# Altium PCB LB77.PcbDoc
Units mm, origin at the board's own origin, x right, y up, seen from the top; angles counter-clockwise.
Board outline 113 x 68 mm, 2 copper layers (Top Layer, Bottom Layer), stack 1.571 mm thick; 61 components, 50 nets, 271 pads, 342 vias.
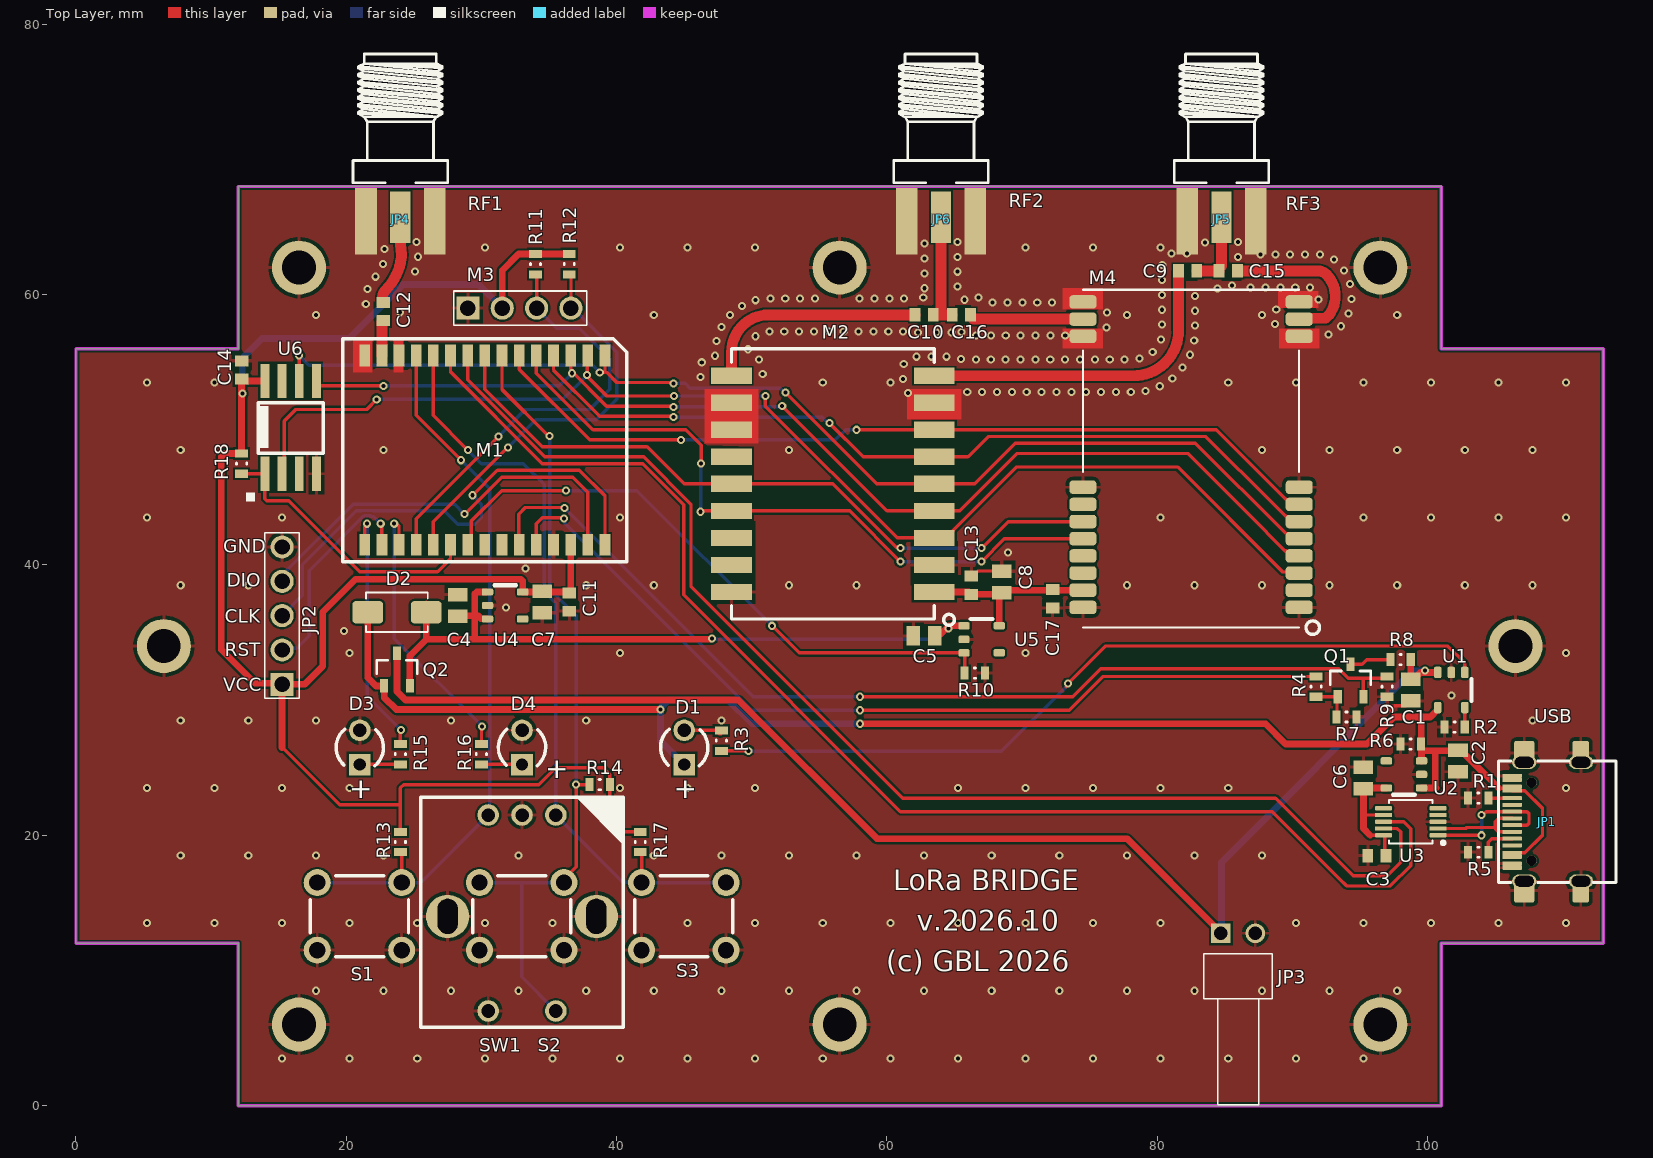
[diagram p0: Top Layer view]
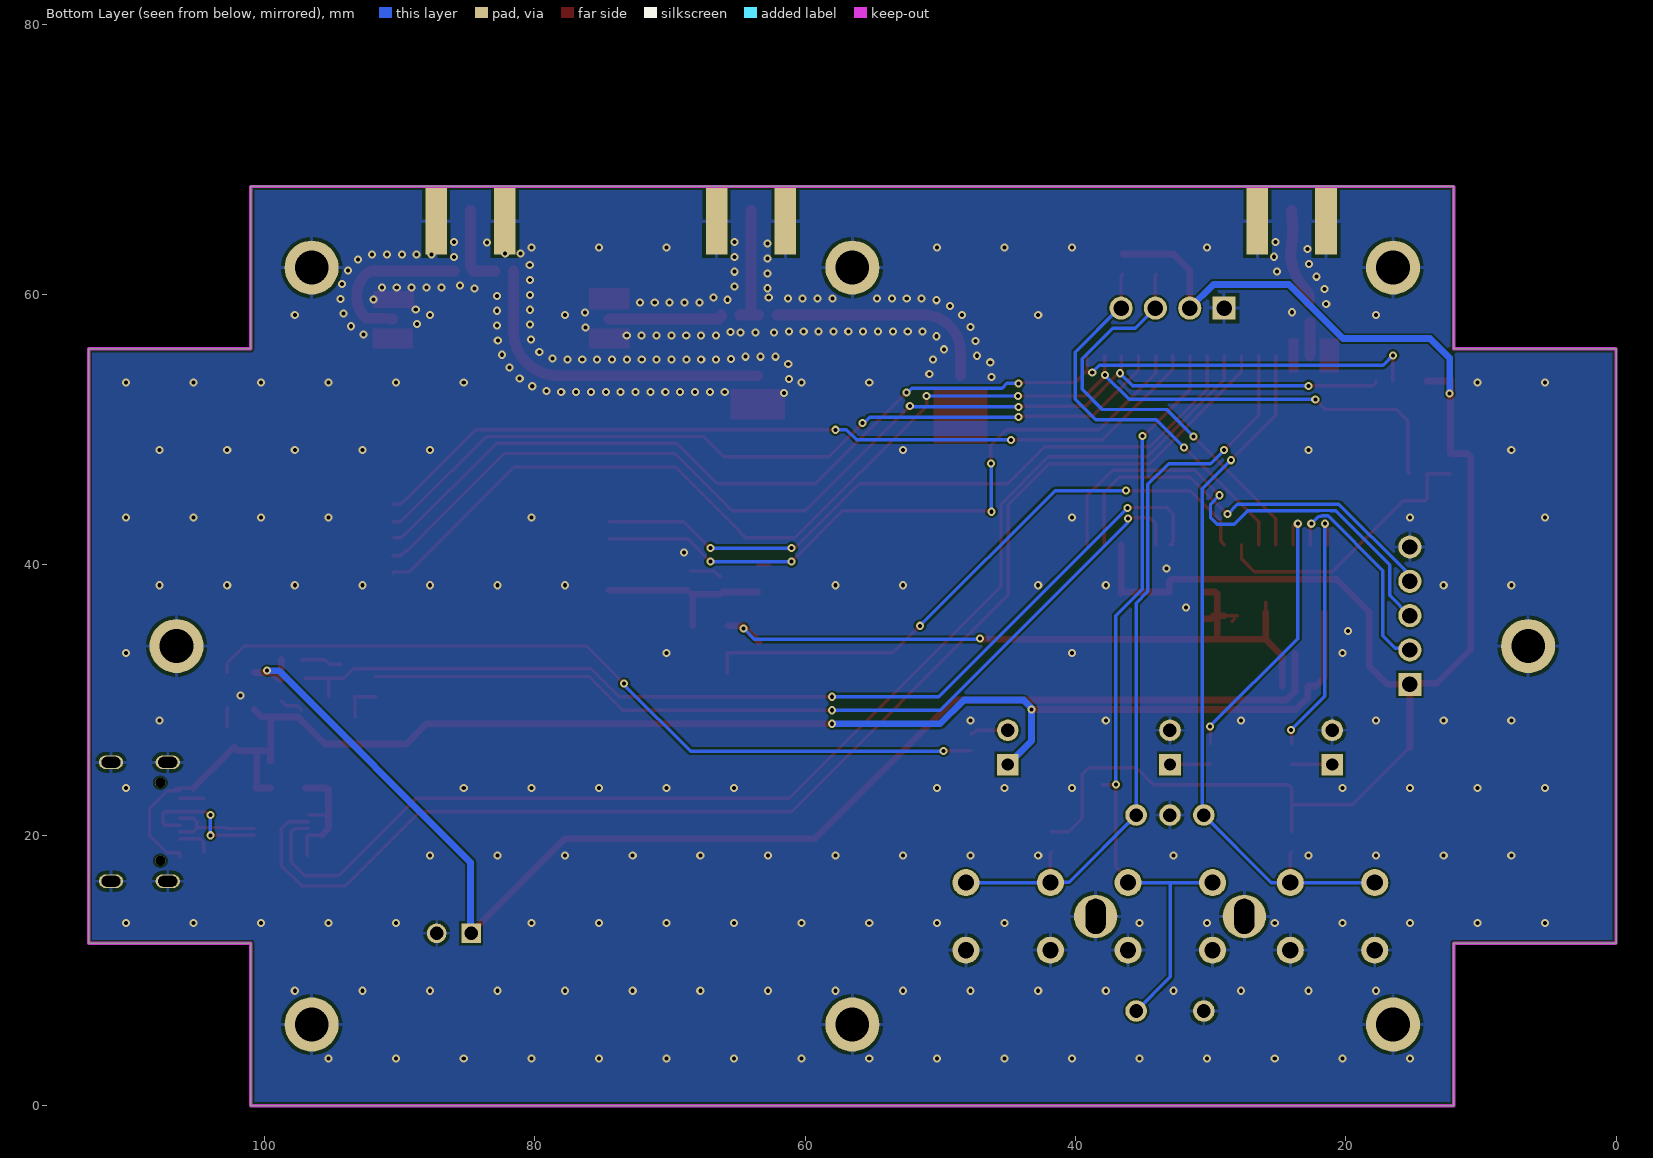
[diagram p1: Bottom Layer view, seen from below]
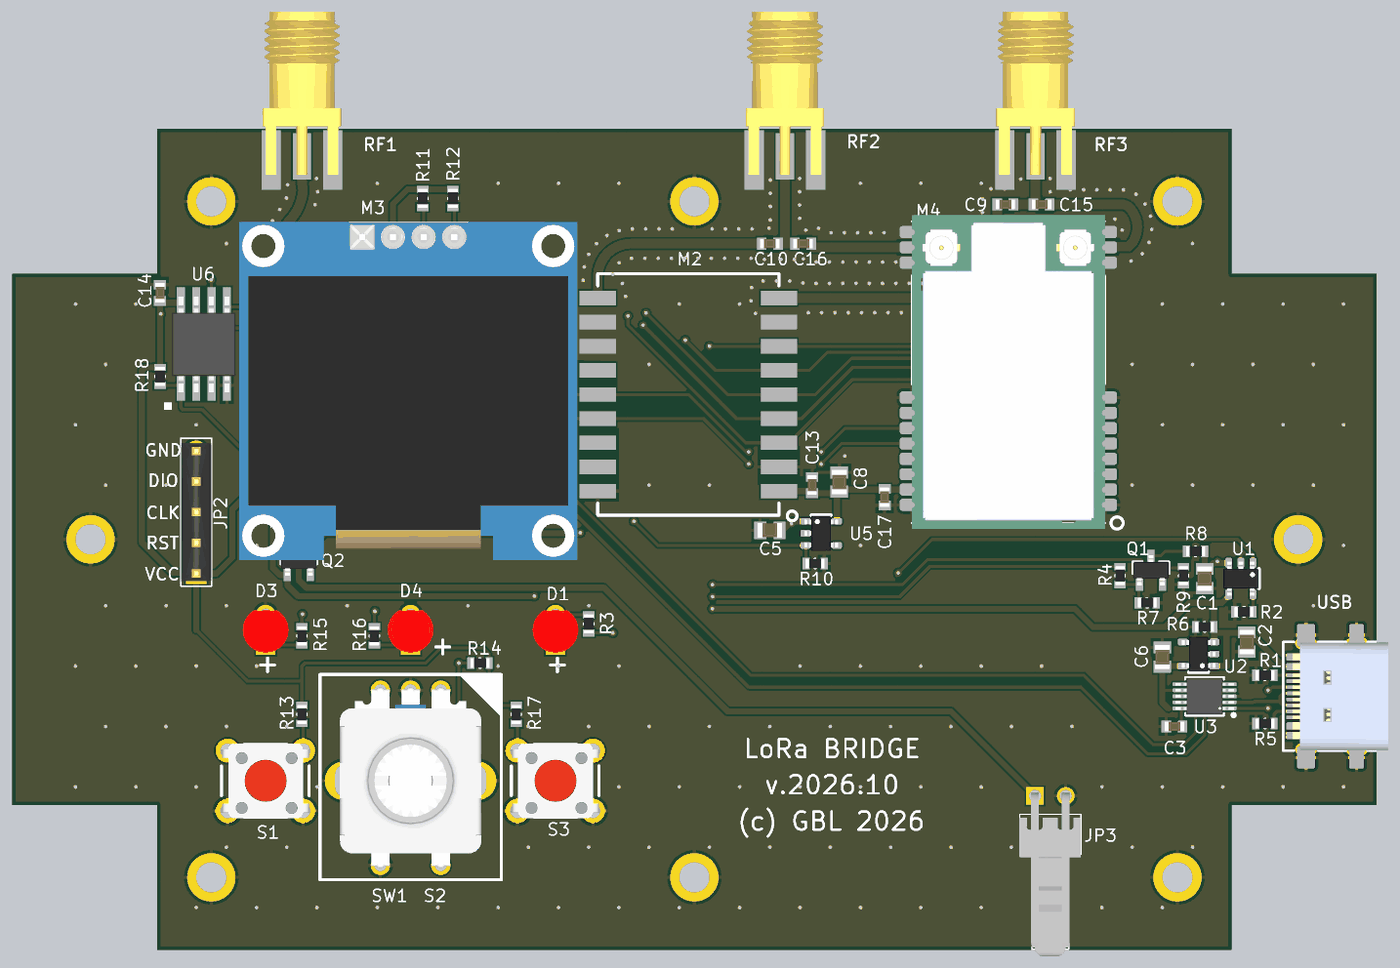
[diagram p2: 3D render of the assembled board from above, using the file's embedded part models]

## Layer stack, top to bottom
Top Solder: solder mask 0.0102, Solder Resist, Dk 3.5
Top Layer: signal copper 0.0356
Dielectric 1: dielectric 1.5, FR-4, Dk 4.8
Bottom Layer: signal copper 0.0356
Bottom Solder: solder mask 0.0102, Solder Resist, Dk 3.5

## Board outline
0,12 0,56 12,56 12,68 101,68 101,56 113,56 113,12 101,12 101,0 12,0 12,12

## Design rules (kind name [scope] priority, off if disabled: settings)
Clearance [All] p1: gap=0.15 ignorepadtopadclearanceinfootprint=FALSE
ComponentClearance ComponentClearance_1 [InComponent('SW1') vs InComponent('S2')] p1: gap=-20 collisioncheckmode=3 verticalgap=-20 showdistances=FALSE
ComponentClearance [All] p2: gap=0.25 collisioncheckmode=3 verticalgap=0.25 showdistances=FALSE
HoleSize [All] p1: absolutevalues=TRUE maxlimit=3.5 minlimit=0.025 maxpercent=80.000 minpercent=20.000
MinimumSolderMaskSliver [All] p1: minsoldermaskwidth=0.05
PolygonConnect PolygonConnect_3 [HasFootprint('SMA_F_EDGE') vs IsNamedPolygon('GND_L01_P000')] p1: connectstyle=Direct reliefconductorwidth=0.254 reliefentries=4 polygonreliefangle="90 Angle" airgapwidth=0.254
PolygonConnect PolygonConnect_2 [All vs IsNamedPolygon('GND_L01_P000') Or IsNamedPolygon('GND_L02_P001')] p2: thpad.connectstyle=Relief thpad.reliefconductorwidth=0.254 thpad.reliefentries=4 thpad.polygonreliefangle="90 Angle" thpad.airgapwidth=0.254 smdpad.connectstyle=Relief smdpad.reliefconductorwidth=0.254 smdpad.reliefentries=4 smdpad.polygonreliefangle="90 Angle" smdpad.airgapwidth=0.254 via.connectstyle=Direct via.reliefconductorwidth=0.254 via.reliefentries=4 via.polygonreliefangle="90 Angle" via.airgapwidth=0.254
PolygonConnect [All] p3: connectstyle=Relief reliefconductorwidth=0.254 reliefentries=4 polygonreliefangle="90 Angle" airgapwidth=0.254
RoutingVias [All] p1: holewidth=0.711 width=1.27 viastyle="Through Hole" minholewidth=0.711 minwidth=1.27 maxholewidth=0.711 maxwidth=1.27
SilkToSilkClearance [All] p1: silktosilkclearance=0.1
SilkToSolderMaskClearance [IsPad] p1: minsilkscreentomaskgap=0.1 clearancetoexposedcopper=TRUE
SolderMaskExpansion [All] p1: expansion=0 istentingtop=FALSE
SupplyNets "Schematic Supply Nets_5" [InNet('VBUS')] p1: voltage=0.000
SupplyNets "Schematic Supply Nets_4" [InNet('VCC2')] p2: voltage=0.000
SupplyNets "Schematic Supply Nets_3" [InNet('GND')] p3: voltage=0.000
SupplyNets "Schematic Supply Nets_2" [InNet('VCC1')] p4: voltage=0.000
SupplyNets "Schematic Supply Nets_1" [InNet('VCC')] p5: voltage=0.000
SupplyNets "Schematic Supply Nets" [InNet('V_BATT')] p6: voltage=0.000
Width [All] p1: maxlimit=2 minlimit=0.2 preferedwidth=0.25
25 further rules are at their usual default settings.

## Components (designator, comment, footprint, x,y, rotation, side; value= is the part's Value field where it differs from the comment)
C1 "10uF" C-0805 98.75,30.75 r270 top
C2 "10uF" C-0805 102.25,25.5 r270 top
C3 "100nF" C-0603 96.25,18.5 r180 top
C4 "10uF" C-0805 28.25,37 r90 top
C5 "10uF" C-0805 62.75,34.75 r180 top
C6 "10uF" C-0805 95.25,24.25 r90 top
C7 "10uF" C-0805 34.5,37.25 r270 top
C8 "CAPN" C-0805 68.5,38.75 r90 top
C9 "100pF" C-0603 82.25,61.75 r0 top
C10 "100pF" C-0603 62.75,58.5 r0 top
C11 "1nF" C-0603 36.5,37.25 r270 top
C12 "100pF" C-0603 22.75,58.75 r90 top
C13 "1nF" C-0603 66.25,38.5 r90 top
C14 "100nF" C-0603 12.25,54.425 r270 top
C15 "100pF" C-0603 85.25,61.75 r180 top
C16 "100pF" C-0603 65.5,58.5 r180 top
C17 "1nF" C-0603 72.25,37.5 r270 top
D1 "DLED" LED_3mm_RED 45,26.5 r90 top locked
D2 "SS14" D-SMA 23.75,36.5 r0 top
D3 "DLED" LED_3mm_RED 21,26.5 r90 top locked
D4 "DLED" LED_3mm_RED 33,26.5 r90 top locked
JP1 "L-KLS1-5473" USB_C_SMD_SLOT 106.25,21 r90 top
JP2 "HEADER 5" PLS1-5 15.25,31.17 r90 top
JP3 "CON2" WH-02R 84.71,12.75 r0 top
JP4 "EM-SA071-GGT" SMA_F_EDGE 24,67 r270 top
JP5 "EM-SA071-GGT" SMA_F_EDGE 84.75,67 r270 top
JP6 "EM-SA071-GGT" SMA_F_EDGE 64,67 r270 top
M1 "E77-400M22S" E77XX-M22 30.25,48.5 r270 top
M2 "LORA2021" LORA1121 56,46 r180 top
M3 "OLED0_96" OLED096_I2C 29,59 r0 top locked
M4 "E80-400M2213S" E80 82.5,47.86 r180 top
Q1 "2N7002" SOT-23 94.3,31.45 r90 top
Q2 "IRLML6401" SOT-23 23.75,32.25 r90 top
R1 "5k1" R-0603 103.75,22.75 r0 top
R2 "4k7" R-0603 102,28 r0 top
R3 "1k" R-0603 47.75,27 r90 top
R4 "1k" R-0603 91.75,31 r90 top
R5 "5k1" R-0603 103.75,18.75 r0 top
R6 "100k" R-0603 98.75,26.75 r0 top
R7 "1M" R-0603 94,28.75 r180 top
R8 "100k" R-0603 98,33 r0 top
R9 "10k" R-0603 97,31 r90 top
R10 "100k" R-0603 66.5,32 r180 top
R11 "10k" R-0603 34,62.25 r90 top
R12 "10k" R-0603 36.5,62.25 r90 top
R13 "100k" R-0603 24,19.5 r90 top
R14 "100k" R-0603 38.75,23.75 r0 top
R15 "1k" R-0603 24,26 r90 top
R16 "1k" R-0603 30,26 r90 top
R17 "100k" R-0603 41.75,19.5 r90 top
R18 "100k" R-0603 12.25,47.5 r90 top
S1 "KLS7-TS3602 -3 15-180" KN_MIN 21,14 r0 top
S2 "KLS7-TS3602 -3 15-180" KN_MIN 33,14 r0 top locked
S3 "KLS7-TS3602 -3 15-180" KN_MIN 45,14 r0 top
SW1 "EC11" EC11 33,14 r270 top locked
U1 "STC4054GR" SOT-23-5 101.75,30.75 r270 top
U2 "LP5907MFX-3.0" SOT-23-5 98.25,24.5 r180 top
U3 "CH340E" MSOP-10 98.75,21 r90 top value={Value}
U4 "LP5907MFX-3.0" SOT-23-5 31.75,37 r0 top
U5 "LP5907MFX-3.0" SOT-23-5 67,34.5 r0 top
U6 "W25Q64FV" SOIC8-208 13.98,46.75 r90 top

## Footprints (in the part's own frame and the unit in brackets; to place one, negate y for a bottom-side part, rotate by r counter-clockwise, add the part's x,y. Pads: shape width x height; smd on the part's side, far side on the other; paste and mask are expansions set on the pad)
C-0603 [mm] "Chip Capacitor, 2-Leads, Body 1,60x0,80mm, IPC Medium Density"
  rect 0.8x1 smd: 1(-0.675,0) 2(0.675,0)
  body extent -0.8,-0.4 0.8,0.4, height 0.8
C-0805 [mm] "Chip Capacitor, 2-Leads, Body 2,00x1,25mm, IPC Medium Density"
  rect 1x1.45 smd: 1(-0.8,0) 2(0.8,0)
  body extent -1,-0.62 1,0.63, height 1.25
D-SMA [mm] "Diode, Molded Body; 4.315 mm L X 2.605 mm W X 2.41 mm H body"
  rrect30% 2.27x1.65 smd: 1(-2.165,0) 2(2.165,0)
  silkscreen extent -2.29,-1.46 2.29,1.46, body extent -2.61,-1.3 2.61,1.3, height 2.41
E77XX-M22 [mm]
  rect 1.6x0.8 smd: 1(-7,8.89) 2(-7,7.62) 3(-7,6.35) 4(-7,5.08) 5(-7,3.81) 6(-7,2.54) 7(-7,1.27) 8(-7,0) 9(-7,-1.27) 10(-7,-2.54) 11(-7,-3.81) 12(-7,-5.08) 13(-7,-6.35) 14(-7,-7.62) 15(-7,-8.89) 16(7,-8.89) 17(7,-7.62) 18(7,-6.35) 19(7,-5.08) 20(7,-3.81) 21(7,-2.54) 22(7,-1.27) 23(7,0) 24(7,1.27) 25(7,2.54) 26(7,3.81) 27(7,5.08) 28(7,6.35) 29(7,7.62) 30(7,8.89)
  silkscreen extent -8.25,-10.5 8.25,10.5, body extent -7,-9.68 7,10.3, height 2.7
E80 [mm]
  rrect50% 2x1 smd: 1(-8,11) 2(-8,9.73) 3(-8,8.46) 4(-8,7.19) 5(-8,5.92) 6(-8,4.65) 7(-8,3.38) 8(-8,2.11) 11(-8,-9.06) 12(-8,-10.33) 13(-8,-11.6) 14(8,-11.6) 15(8,-10.33) 16(8,-9.06) 19(8,2.11) 20(8,3.38) 21(8,4.65) 22(8,5.92) 23(8,7.19) 24(8,8.46) 25(8,9.73) 26(8,11)
  silkscreen extent -9.5,-12.5 8,13, body extent -8,-13 8,13, height 2.85
EC11 [mm] "ALPS rotary encoder"
  round 1.6 hole 1: 1(-7.5,2.5) 2(-7.5,0) 3(-7.5,-2.5) 4(7,-2.5) 5(7,2.5)
  round 3.2 hole 1.5 slot 2.6 at 0 deg: 6(0,5.5) 6(0,-5.5)
  silkscreen extent -8.8,-7.5 8.2,7.5, body extent -7.73,-5.86 7.22,5.86, height 19.5
KN_MIN [mm]
  round 2 hole 1.2 mask+0.05: 1(-3.15,-2.5) 1(3.1,-2.5) 2(-3.15,2.5) 2(3.1,2.5)
  silkscreen extent -3.66,-3 3.6,3, body extent -3.95,-3.1 3.95,3.1, height 7.01
LED_3mm_RED [mm]
  rect 1.6x1.6 hole 0.9: 1(-1.27,0)
  round 1.6 hole 1: 2(1.27,0)
  silkscreen extent -1.34,-1.75 1.34,1.75, body extent -1.9,-1.9 1.6,1.9, height 5.75
LORA1121 [mm]
  rect 3x1.2 smd: 1(-7.5,8) 2(-7.5,6) 3(-7.5,4) 4(-7.5,2) 5(-7.5,0) 6(-7.5,-2) 7(-7.5,-4) 8(-7.5,-6) 9(-7.5,-8) 10(7.5,-8) 11(7.5,-6) 12(7.5,-4) 13(7.5,-2) 14(7.5,0) 15(7.5,2) 16(7.5,4) 17(7.5,6) 18(7.5,8)
  silkscreen extent -8.99,-10 7.5,10.46, body extent -7.5,-10 7.5,10, height 2
MSOP-10 [mm] "Small Outline Pkg (SOP), 0.50 mm pitch; 10 pin, 3.00 mm L X 3.00 mm W X 1.10 mm H body"
  rrect52% 0.31x1.27 smd: 1(-1,-2.015) 2(-0.5,-2.015) 3(0,-2.015) 4(0.5,-2.015) 5(1,-2.015) 6(1,2.015) 7(0.5,2.015) 8(0,2.015) 9(-0.5,2.015) 10(-1,2.015)
  silkscreen extent -1.68,-2.53 1.6,1.6, body extent -1.5,-2.42 1.5,2.42, height 1.1
OLED096_I2C [mm] "Header, Vertical, 2.54 mm pitch; 0.70 mm lead width, 7 pins, 1 row, 7 pins per row, 16.51 mm L X 2.54 mm W X 7.54 mm H body"
  rect 1.71x1.71 hole 1.14 paste-2539.97: 1(0,0)
  round 1.71 hole 1.14 paste-2539.97: 2(2.54,0) 3(5.08,0) 4(7.62,0)
  silkscreen extent -1.04,-1.27 8.8,1.27, body extent -10.19,-26.7 17.81,1.3, height 7.08
PLS1-5 [mm] "Header, Vertical, 2.54 mm pitch; 0.70 mm lead width, 5 pins, 1 row, 5 pins per row, 11.43 mm L X 2.54 mm W X 7.54 mm H body"
  rect 1.71x1.71 hole 1.14 paste-2539.97: 1(0,0)
  round 1.71 hole 1.14 paste-2539.97: 2(2.54,0) 3(5.08,0) 4(7.62,0) 5(10.16,0)
  silkscreen extent -1.04,-1.27 11.2,1.27, body extent -0.64,-1.27 10.79,1.27, height 7.54
R-0603 [mm] "Chip Resistor, 2-Leads, Body 1,60x0,82mm, IPC Medium Density"
  rect 0.6x0.95 smd: 1(-0.75,0) 2(0.75,0)
  silkscreen extent -0.05,-0.38 0.05,0.38, body extent -0.8,-0.4 0.8,0.4, height 0.45
SMA_F_EDGE [mm] "SMA End Launch Jack for 1.58mm PCB, 50 Ohm, Flat Tab Contact"
  rect 3.81x1.5 smd: 1(1.27,0)
  rect 4.9x1.6 smd: 2(1.575,2.54) 2(1.575,-2.54)
  rect 4.9x1.6 smd far side: 2(1.575,2.54) 2(1.575,-2.54)
  silkscreen extent -10.81,-3.5 -1.28,3.5, body extent -10.73,-3.25 2.77,3.25, height 3.7
SOIC8-208 [mil]
  rect 100x26 smd: 1(0,0) 2(0,-50) 3(0,-100) 4(0,-150) 5(270,-150) 6(270,-100) 7(270,-50) 8(270,0)
  silkscreen extent -80,-170 207,55, body extent -22,-179 289,29, height 39
SOT-23 [mm]
  rect 1x0.6 smd: 1(-1.2,0.95) 2(-1.2,-0.95) 3(1.2,0)
  silkscreen extent -0.3,-1.5 0.7,1.5, body extent -1.25,-1.5 1.25,1.5, height 1.2
SOT-23-5 [mm]
  rrect50% 0.85x0.55 smd mask+0.06: 1(-1.3,1) 2(-1.3,0) 3(-1.3,-1) 4(1.3,-1) 5(1.3,1)
  silkscreen extent -0.8,1.5 0.8,1.5, body extent -1.4,-1.45 1.4,1.45, height 1.45
USB_C_SMD_SLOT [mm] "USB 3.1 Type C"
  rrect20% 1.8x1.2 smd mask+0.07: 1(-5.08,-5.08) 1(5.08,-5.08)
  rrect20% 1.8x1.5 smd mask+0.07: 1(-5.08,-0.9) 1(5.08,-0.9)
  oval 1x1.8 hole 0.8 slot 1.4 at 90 deg: 1(-4.4,-5.1) 1(-4.4,-0.9) 1(4.4,-5.1) 1(4.4,-0.9)
  rrect30% 0.3x1.45 smd paste-2 mask+0.07: A1(-3.1,0) A4(-2.6,0) A9(2.6,0) A12(3.4,0) B1(3.1,0) B4(2.3,0) B9(-2.3,0) B12(-3.4,0)
  rrect30% 0.3x1.45 smd mask+0.07: A5(-1.25,0) A6(-0.25,0) A7(0.25,0) A8(1.25,0) B5(1.75,0) B6(0.75,0) B7(-0.75,0) B8(-1.75,0)
  round 0.75 hole 0.75 unplated paste-2539.97 mask+0.07: MH(-2.885,-1.44) MH(2.885,-1.44)
  silkscreen extent -4.5,-7.69 4.5,1, body extent -4.47,-7.7 4.47,0.2, height 3.2
WH-02R [mm]
  rect 1.45x1.45 hole 1: 1(0,0)
  round 1.45 hole 1: 2(2.54,0)
  silkscreen extent -1.27,-12.7 3.81,-1.52, body extent -1.3,-13.3 3.8,0.27, height 5.9

## Part data
C1 C2 C3 C4 C5 C6 C7 C9 C10 C11 C12 C13 C14 C15 C16 C17: library part CAPN, Voltage=50V, Вид=Конденсатор, Точність/група=NP0
C8: Voltage=50V, Вид=Конденсатор, Точність/група=NP0
D2: library part DIODSH, Вид=Діод
JP4 JP5 JP6: library part SMA, "SMA Female R/A PCB Mount", Вид=Роз'єм
M2: library part LORAXX21
M3: library part OLED0_96_I2C
M4: library part E80
Q1: library part MOSF-N, Вид=Транзистор
Q2: library part MOSF-P, Вид=Транзистор
R1 R2 R3 R4 R5 R6 R7 R8 R9 R10 R11 R12 R13 R14 R15 R16 R17 R18: library part RES, Вид=Резистор, Точність/група=5%
S1 S2 S3: library part SW-1, Вид=Кнопка
U1: library part STC4054
U2 U4 U5: library part LP5907, "250mA Low-Dropout Regulator", Вид=Мікросхема
D1 D3 D4: Вид=Світлодіод
JP1 U3: Mounting  Method=SMD
JP2 JP3: Вид=Роз'єм
U6: Вид=Мікросхема

## Free pads (board coordinates)
  round 4 hole 2.5: 0(6.5,34) 0(16.5,6) 0(16.5,62) 0(56.5,6) 0(56.5,62) 0(96.5,6) 0(96.5,62) 0(106.5,34)

## Via types
v1: diameter 0.6, hole 0.3, Top Layer to Bottom Layer, tented both sides, 342 vias

## Nets (pads, with @x,y where several pads share a name; then routed paths per layer and width w, separated by ;. In a path a pad name is that pad's centre, name@x,y a point inside that pad or via, vN(x,y) a via of type N, cw(c..) or ccw(c..) an arc to the next point about the centre after c; other vN are vias at no path point)
ACT/WKUP: M1.7 R14.1 S2.2 SW1.5 | length 59.5
  Top Layer w0.25: M1.7 31.52,52.98 v1@35,49.5 ; S2.2@36.1,16.5 36.1,16.785 37,17.685 v1(37,23.75) R14.1
  Bottom Layer w0.25: S2.2@29.85,16.5 32.975,16.5 ; v1(35.045,49.551) 35.045,38.205 37,36.25 v1(37,23.75) ; SW1.5 32.975,9.525 32.975,16.5 ; S2.2@36.1,16.5 32.975,16.5
ADC: M1.23
BATT_LEVEL: M1.25 Q1.2 R9.2 | length 75.4
  Top Layer w0.25: M1.25 33,41.5 32.75,41.75 32.75,43.75 33.25,44.25 v1@36.25,44.25 ; v1(58,30.25) 73.75,30.25 75.827,32.327 93.431,32.327 93.723,32.035 94.135,31.623 95.25,31.623 ; Q1.2 95.25,31.623 ; R9.2@97,31.623 95.25,31.623
  Bottom Layer w0.25: v1(36.134,44.221) 50.106,30.25 v1(58,30.25)
BATT_MEAS: M1.26 R4.2 | length 66.6
  Top Layer w0.25: M1.26 34.06,43.06 34.5,43.5 36.04,43.5 v1(36.101,43.438) ; v1(58,29.25) 73.5,29.25 76,31.75 R4.2@91.795,31.75
  Bottom Layer w0.25: v1(36.101,43.438) 36.168,43.372 36.168,43.082 50,29.25 v1(58,29.25)
BUSY1121: M1.6 M2.7 M4.7 | length 63.5
  Top Layer w0.25: M1.6 32.79,54.46 38,49.25 v1(44.75,49.25) ; v1(57.75,50) 84.358,50 89.119,45.239 89.489,44.869 89.544,44.869 89.933,44.48 M4.7
  Bottom Layer w0.25: v1(44.75,49.25) 56.178,49.25 56.942,50.014 57.736,50.014 v1(57.75,50)
DN: JP1.A7 JP1.B7 U3.2 | length 7.5
  Top Layer w0.254: U3.2 102.81,20.5 102.886,20.577 105,20.577 ; JP1.B7 106.227,20.273 105.227,20.273 105,20.5 105,20.577 ; JP1.A7 105.25,21.25 105,21 105,20.577
DOWN: M1.12 R13.1 S1.2 SW1.3 | length 53.3
  Top Layer w0.25: R13.1 24.1,18.65 S1.2@24.1,16.5 ; M1.12 25.17,51.08 v1(28.5,47.75)
  Bottom Layer w0.25: S1.2@17.85,16.5 24.1,16.5 25.5,16.5 SW1.3 30.622,21.622 30.622,45.628 v1(28.5,47.75)
DP: JP1.A6 JP1.B6 U3.1 | length 10.4
  Top Layer w0.25: v1(104,21.5) 104.095,21.5 104.345,21.75 JP1.B6 107.354,21.75 107.5,21.604 107.5,20.896 107.354,20.75 JP1.A6
  Top Layer w0.254: U3.1 v1(104,20)
  Bottom Layer w0.25: v1(104,20) v1(104,21.5)
EN1121: M1.22 R10.2 U5.3 | length 45.8
  Top Layer w0.25: M1.22 29.253,41.773 29.253,43.253 31.5,45.5 v1(36.25,45.5) ; v1(51.5,35.5) 53.5,33.5 65.75,33.5 65.75,32.25 R10.2
  Bottom Layer w0.25: v1(36.25,45.5) 41.5,45.5 v1(51.5,35.5)
FLASH_CE: M1.21 R18.1 U6.1 | length 21
  Top Layer w0.25: R18.1 U6.1 13.98,44.899 14.129,44.75 15.75,44.75 21,39.5 26.75,39.5 27.71,40.46 M1.21
GND: C1.2 C2.2 C3.2 C4.2 C5.2 C6.2 C7.2 C8.2 C11.2 C13.2 C14.1 C17.2 D3.2 D4.2 JP1.1 JP1.A1 JP1.A12 JP1.B1 JP1.B12 JP2.5 JP3.2 JP4.2 JP5.2 JP6.2 M1.13 M1.15 M1.27 M2.2 M2.8 M2.11 M2.12 M2.18 M3.1 M4.1 M4.8 M4.11 M4.13 M4.14 M4.16 M4.19 M4.26 pad.0 R1.1 R2.1 R5.1 R6.1 R7.1 R9.1 R10.1 S1.1 S2.1 S3.1 SW1.2 SW1.4 SW1.6 U1.2 U2.2 U3.3 U4.2 U5.2 U6.4 | length 5.1
  Top Layer w0.25: M2.2@62.6,40 M2.2 ; C13.2 66.35,39.175 66.725,39.55 C8.2 ; 97.25,29.25 97.575,29.575 98.375,29.575 C1.2
  other v1: 15.25,3.5 20.25,3.5 25.25,3.5 30.25,3.5 35.25,3.5 40.25,3.5 45.25,3.5 50.25,3.5 55.25,3.5 60.25,3.5 65.25,3.5 70.25,3.5 75.25,3.5 80.25,3.5 85.25,3.5 90.25,3.5 95.25,3.5 17.75,8.5 22.75,8.5 27.75,8.5 32.75,8.5 37.75,8.5 42.75,8.5 47.75,8.5 52.75,8.5 57.75,8.5 62.75,8.5 67.75,8.5 72.75,8.5 77.75,8.5 82.75,8.5 87.75,8.5 92.75,8.5 97.75,8.5 5.25,13.5 10.25,13.5 15.25,13.5 20.25,13.5 25.25,13.5 30.25,13.5 35.25,13.5 45.25,13.5 50.25,13.5 55.25,13.5 60.25,13.5 65.25,13.5 70.25,13.5 75.25,13.5 80.25,13.5 90.25,13.5 95.25,13.5 100.25,13.5 105.25,13.5 110.25,13.5 7.75,18.5 12.75,18.5 17.75,18.5 22.75,18.5 32.75,18.5 42.75,18.5 47.75,18.5 52.75,18.5 57.75,18.5 62.75,18.5 67.75,18.5 72.75,18.5 77.75,18.5 82.75,18.5 87.75,18.5 5.25,23.5 10.25,23.5 15.25,23.5 20.25,23.5 40.25,23.5 45.25,23.5 50.25,23.5 65.25,23.5 70.25,23.5 75.25,23.5 80.25,23.5 85.25,23.5 110.25,23.5 7.75,28.5 12.75,28.5 17.75,28.5 27.75,28.5 37.75,28.5 47.75,28.5 107.75,28.5 101.753,30.349 20.25,33.5 40.25,33.5 70.25,33.5 110.25,33.5 19.823,35.111 31.823,36.861 7.75,38.5 12.75,38.5 37.75,38.5 42.75,38.5 52.75,38.5 57.75,38.5 77.75,38.5 82.75,38.5 87.75,38.5 92.75,38.5 97.75,38.5 102.75,38.5 107.75,38.5 33.25,39.75 68.946,40.915 5.25,43.5 15.25,43.5 40.25,43.5 80.25,43.5 95.25,43.5 100.25,43.5 105.25,43.5 110.25,43.5 7.75,48.5 22.75,48.5 52.75,48.5 87.75,48.5 92.75,48.5 97.75,48.5 102.75,48.5 107.75,48.5 61.565,52.726 65.94,52.785 67.04,52.785 68.14,52.785 69.24,52.785 70.34,52.785 71.44,52.785 72.54,52.785 73.64,52.785 74.74,52.785 75.84,52.785 76.94,52.785 78.04,52.785 79.136,52.877 80.181,53.22 5.25,53.5 10.25,53.5 55.25,53.5 60.25,53.5 85.25,53.5 90.25,53.5 95.25,53.5 100.25,53.5 105.25,53.5 110.25,53.5 61.193,53.761 81.11,53.808 46.193,53.898 50.807,54.135 81.879,54.595 61.242,54.86 46.297,54.993 50.532,55.2 66.583,55.215 67.683,55.215 68.783,55.215 69.883,55.215 70.983,55.215 72.083,55.215 73.183,55.215 74.283,55.215 75.383,55.215 76.483,55.215 77.583,55.215 65.483,55.238 78.682,55.263 62.196,55.407 63.296,55.407 64.396,55.407 47.285,55.476 82.421,55.552 79.662,55.762 49.732,55.955 47.378,56.572 82.731,56.608 80.261,56.685 50.262,56.919 66.589,56.975 67.689,56.975 68.789,56.975 69.889,56.975 70.989,56.975 72.089,56.975 73.189,56.975 92.665,57.061 62.296,57.193 63.677,57.193 64.777,57.193 65.522,57.239 51.3,57.285 52.4,57.285 53.5,57.285 54.6,57.285 55.7,57.285 56.8,57.285 57.9,57.285 59,57.285 60.1,57.285 61.2,57.285 76.246,57.576 47.748,57.608 93.587,57.662 82.79,57.706 80.36,57.78 88.701,57.817 48.394,58.498 17.75,58.5 42.75,58.5 77.75,58.5 87.75,58.5 97.75,58.5 94.145,58.61 76.281,58.676 23.98,58.696 82.79,58.806 80.36,58.88 88.803,58.913 49.263,59.173 21.443,59.311 67.818,59.405 68.918,59.405 70.018,59.405 71.118,59.405 72.218,59.405 50.282,59.587 65.728,59.623 91.926,59.626 94.376,59.685 51.374,59.715 52.474,59.715 53.574,59.715 54.674,59.715 57.974,59.715 59.074,59.715 60.174,59.715 61.274,59.715 62.684,59.779 66.784,59.779 82.79,59.906 80.36,59.98 21.565,60.405 84.443,60.443 62.785,60.473 86.908,60.535 88.008,60.535 89.108,60.535 90.208,60.535 91.308,60.535 65.215,60.596 85.521,60.661 94.263,60.779 80.36,61.08 22.166,61.326 62.785,61.573 65.215,61.696 25.091,61.722 93.816,61.784 80.368,62.18 22.721,62.276 93.07,62.593 62.785,62.673 25.297,62.803 65.215,62.796 85.965,62.796 87.632,62.965 88.732,62.965 89.832,62.965 90.932,62.965 92.032,62.957 81.053,63.041 82.184,63.029 22.819,63.371 30.25,63.5 40.25,63.5 45.25,63.5 50.25,63.5 70.25,63.5 75.25,63.5 80.25,63.5 62.785,63.773 83.535,63.849 25.205,63.899 65.215,63.896 85.965,63.896
GREEN: M1.16 R15.2 | length 18.8
  Top Layer w0.25: M1.16 21.36,42.86 v1@21.5,43 ; R15.2 v1@24,27.75
  Bottom Layer w0.25: v1(21.545,43.051) 21.545,30.301 v1(24.045,27.801)
INT1121: M1.5 M2.15 M4.22 | length 51.2
  Top Layer w0.25: M1.5 34.06,54.19 38.25,50 45.111,50 46.25,48.861 v1(46.25,47.5) ; v1@46.25,44 M2.15 57.25,44 v1(61,40.25) ; v1(67,40.25) 68.69,41.94 M4.22
  Bottom Layer w0.25: v1(46.203,43.935) 46.226,43.959 46.226,47.476 v1(46.25,47.5) ; v1(61,40.25) v1(67,40.25)
MISO: M1.2 M2.3 M4.3 U6.2 | length 93
  Top Layer w0.25: U6.2 15.401,46.901 15.401,50.651 16.25,51.5 21.5,51.5 v1(22.25,52.25) ; v1(37.815,54.048) v1@37.884,54.116 ; M1.2 37.815,55.445 37.815,54.185 v1@37.884,54.116 ; v1(44.25,52.5) 39.269,52.5 37.881,53.888 37.881,54.114 v1@37.884,54.116 ; v1(51,52.5) 51,51.75 60.75,42 64.4,42 64.873,42.473 64.873,42.531 69.592,47.25 81.5,47.25 89.271,39.479 90.421,39.479 M4.3
  Bottom Layer w0.25: v1(22.25,52.25) 36.018,52.25 v1(37.815,54.048) ; v1(44.25,52.5) v1(51,52.5)
MOSI: M1.3 M2.4 M4.4 U6.5 | length 83.8
  Top Layer w0.25: U6.5 17.79,53.453 17.993,53.25 v1(22.75,53.25) ; M1.3 36.6,54.4 39.25,51.75 v1@44.25,51.75 ; v1(52.25,51.75) 60,44 65.381,44 69.631,48.25 82.25,48.25 86.75,43.75 89.441,41.059 89.544,41.059 89.933,40.67 M4.4
  Bottom Layer w0.25: v1(22.75,53.25) 35.768,53.25 v1(36.703,54.185) ; v1(44.203,51.685) 44.235,51.718 52.218,51.718 v1(52.25,51.75)
NetC4_1: C4.1 C5.1 D2.2 Q2.2 U4.1 U4.3 U5.1 | length 55.2
  Top Layer w0.25: D2.2 D2.2@25.915,37.25 ; C4.1@28.005,36.25 C4.1@28.975,36.25 ; C4.1@28.24,35.987 C4.1@28.4,35.827 ; 30.4,34.6 30.5,34.5
  Top Layer w0.5: Q2.2 24.7,33.285 25.915,34.5 ; D2.2 25.915,34.5 ; 29,36.25 29.5,36.25 29.75,36.25 29.975,36.025 30.425,36.025 U4.3 ; 29.5,36 29.5,34.5 ; 29.5,36.275 29.5,37.851 29.649,38 U4.1@30.343,38 ; 30.4,34.5 29.5,34.5 ; 30.5,34.5 v1@47,34.5 ; C5.1@63.413,34.337 64.575,35.5 U5.1 ; 25.915,34.5 29.5,34.5
  Bottom Layer w0.25: v1(47.045,34.551) 47.096,34.5 63.744,34.5 v1(64.545,35.301)
NetC9_1: C9.1 M2.9 | length 24.4
  Top Layer w0.8: M2.9 78.25,54 ccw(c78.25,57.325) 81.575,57.325 C9.1
NetC10_1: C10.1 M2.10 | length 16.9
  Top Layer w0.8: M2.10 48.5,55.75 cw(c51.25,55.75) 51.25,58.5 C10.1
NetC12_1: C12.1 M1.14 | length 2.6
  Top Layer w0.25: C12.1@22.63,57.955 C12.1
  Top Layer w0.8: M1.14 C12.1@22.63,57.955
NetC12_2: C12.2 JP4.1 | length 7.2
  Top Layer w0.8: C12.2@22.75,59.425 cw(c23.473,59.767) 22.902,60.326 ccw(c19.92,63.264) 24.071,62.725 ccw(c19.92,63.264) 24.083,62.831 ccw(c23.287,62.912) 24.087,62.912 ccw(c23.287,62.912) 24.087,62.923 ccw(c23.287,62.912) 24.083,62.998 ccw(c23.287,62.912) 24.082,63 23.892,64.725 JP4.1@24,66.23
NetC15_1: C15.1 M4.12 | length 12.2
  Top Layer w0.8: C15.1 91.896,61.75 cw(c91.896,60.896) 92.5,61.5 cw(c90.875,59.875) 92.742,58.536 92.691,58.484 92.457,58.25 91.1,58.25 M4.12
NetC16_1: C16.1 M4.15 | length 8.5
  Top Layer w0.8: C16.1 66.175,58.4 66.385,58.19 M4.15
NetD1_2: D1.2 R3.2 | length 2.9
  Top Layer w0.25: D1.2 47.305,27.77 47.575,27.5 R3.2@47.75,27.5
NetD3_1: D3.1 R15.1 | length 3
  Top Layer w0.25: D3.1 21.02,25.25 R15.1
NetD4_1: D4.1 R16.1 | length 3
  Top Layer w0.25: R16.1 33.02,25.25 D4.1
NetJP1_A5: JP1.A5 R5.2 | length 2.6
  Top Layer w0.25: R5.2 104.5,19.5 104.75,19.75 105,19.75 JP1.A5
NetJP1_B5: JP1.B5 R1.2 | length 1.8
  Top Layer w0.25: R1.2 JP1.B5
NetQ1_1: Q1.1 R4.1 R7.2 | length 3.1
  Top Layer w0.25: R4.1 Q1.1 93.3,30.2 93.3,28.8 R7.2
NetQ1_3: Q1.3 R8.1 | length 3.1
  Top Layer w0.25: Q1.3 95.15,32.65 95.5,33 R8.1
NetR2_2: R2.2 U1.5 | length 1.5
  Top Layer w0.25: R2.2 U1.5
NetR3_1: R3.1 U1.1 | length 59.5
  Top Layer w0.25: R3.1 v1(49.75,26.25) ; v1@73.25,31 73.428,31.178 73.428,31.265 76.163,34 101.5,34 102.75,32.75 U1.1
  Bottom Layer w0.25: v1(49.75,26.25) 49.779,26.221 68.471,26.221 v1@73.25,31
  other v1: 73.384,31.221
NRST: JP2.2 M1.17 | length 16
  Top Layer w0.25: v1@22.5,43 22.63,42.87 M1.17
  Bottom Layer w0.25: JP2.2 15.377,33.837 16.337,33.837 17.25,34.75 17.25,39.572 21.306,43.628 21.784,43.628 21.831,43.581 22.015,43.581 v1(22.545,43.051)
NSS1121: M1.4 M2.6 M4.6 | length 62.2
  Top Layer w0.25: M1.4 35.33,54.42 38.75,51 v1@44.25,51 ; v1(55.75,50.5) 58.25,48 M2.6 66,48 67.5,49.5 83.588,49.5 88.611,44.477 89.489,43.599 89.544,43.599 89.933,43.21 M4.6
  Bottom Layer w0.25: v1(44.203,50.935) 55.222,50.935 55.657,50.5 v1(55.75,50.5)
RED: M1.18 R16.2 | length 20.5
  Top Layer w0.25: v1@23.75,43 23.9,42.85 M1.18 ; R16.2 v1@30,28
  Bottom Layer w0.25: v1(23.545,43.051) 23.545,34.551 v1(30.045,28.051)
RF1: C9.2 C15.2 JP5.1 | length 6
  Top Layer w0.25: C15.2@84.564,61.937 C15.2@84.75,62.123
  Top Layer w0.8: C9.2 C15.2 ; C15.2@84.75,62.123 JP5.1@84.75,66.23
RF2: C10.2 C16.2 JP6.1 | length 9.2
  Top Layer w0.25: C10.2 C10.2@63.425,58.6
  Top Layer w0.8: C10.2 64,58.5 ; JP6.1@64,66.23 64,58.5 ; C16.2 64,58.5
RST1121: M1.8 M2.14 M4.21 | length 52.4
  Top Layer w0.25: M1.8 30.25,53 34.5,48.75 42.25,48.75 45,46 M2.14 56,46 60.683,41.317 60.933,41.317 v1(61,41.25) ; v1(67,41.25) 68.96,43.21 M4.21
  Bottom Layer w0.25: v1(61,41.25) v1(67,41.25)
RXD: M1.10 U3.8 | length 97.5
  Top Layer w0.25: M1.10 27.71,54.29 34.5,47.5 41.929,47.5 44.964,44.464 44.964,37.786 61,21.75 88.5,21.75 93.5,16.75 94,16.25 97.25,16.25 98.75,17.75 98.75,20.5 98.25,21 U3.8
SCK: M1.1 M2.5 M4.5 U6.6 | length 84.8
  Top Layer w0.25: v1(16.5,55.5) 16.51,55.49 16.51,53.618 U6.6 ; v1(38.75,54.25) 38.759,54.241 39.14,54.241 M1.1 ; 39.259,54.241 40,53.5 v1@44,53.5 ; v1(52.5,52.75) 59.25,46 66.5,46 69.5,49 82.818,49 89.489,42.329 89.544,42.329 89.873,42 M4.5@90.42,42
  Bottom Layer w0.25: v1(16.5,55.5) 17.238,54.762 38.238,54.762 v1(38.75,54.25) ; v1(44.203,53.435) 45.065,53.435 45.425,53.075 52.104,53.075 52.429,52.75 v1(52.5,52.75)
SCL: M1.19 M3.3 R11.1 | length 32
  Top Layer w0.25: M1.19 25.17,43.42 v1(31.25,49.5) ; R11.1 34.08,61.42 M3.3
  Bottom Layer w0.25: v1(31.25,49.5) 33.25,51.5 38,51.5 39.5,53 39.5,55.25 37.25,57.5 35.58,57.5 M3.3
SDA: M1.20 M3.4 R12.1 | length 29.7
  Top Layer w0.25: M1.20 26.44,43.19 v1@31.944,48.694 ; R12.1 36.62,61.38 M3.4
  Bottom Layer w0.25: v1(31.953,48.685) 34.018,50.75 38.5,50.75 40,52.25 40,55.75 M3.4@36.74,59.01
SWCLK: JP2.3 M1.30 | length 36.8
  Top Layer w0.25: v1(29.342,45.158) 31.184,47 37.25,47 39.14,45.11 M1.30
  Bottom Layer w0.25: JP2.3 16.75,37.75 16.75,40 20.75,44 21.107,44 21.139,44.032 21.951,44.032 21.983,44 27.25,44 28.25,43 29.5,43 30,43.5 30,44.5 v1(29.342,45.158)
SWDIO: JP2.4 M1.29 | length 31
  Top Layer w0.25: v1(28.742,43.766) 28.766,43.766 31.5,46.5 36.75,46.5 37.87,45.38 M1.29
  Bottom Layer w0.25: JP2.4 15.25,39.184 15.64,39.574 15.64,39.64 20.5,44.5 28.008,44.5 v1(28.742,43.766)
TXD: M1.9 U3.9 | length 93.6
  Top Layer w0.25: M1.9 28.98,53.699 34.679,48 42,48 45.5,44.5 45.5,38.425 61.175,22.75 88.75,22.75 94.5,17 97,17 98,18 98,20.25 97.75,20.5 U3.9
UP: M1.11 R17.1 S3.2 SW1.1 | length 56.5
  Top Layer w0.25: M1.11 26.44,51.06 v1(29,48.5) ; R17.1 41.85,18.65 S3.2@41.85,16.5
  Bottom Layer w0.25: v1(29,48.5) 30,47.5 33.101,47.5 34.641,45.96 34.641,38.038 35.5,37.179 SW1.1 40.469,16.531 41.819,16.531 41.85,16.5 S3.2@48.1,16.5
V_BATT: C1.1 JP3.1 Q2.3 R8.2 U1.3 | length 99.6
  Top Layer w0.25: C1.1 C1.1@98.975,31.55
  Top Layer w0.5: Q2.3 23.75,30.634 24.384,30 49,30 59.25,19.75 77.75,19.75 JP3.1@84.25,13.25 ; C1.1 R8.2 ; C1.1@98.975,31.55 99.475,32.05 U1.3
  Bottom Layer w0.5: 84.75,13.488 84.75,18 98.929,32.179 v1(99.81,32.179)
VBUS: C2.1 D1.1 D2.1 JP1.A4 JP1.A9 JP1.B4 JP1.B9 Q2.1 R6.2 U1.4 U2.1 U2.3 | length 116.5
  Top Layer w0.25: 100.564,23.561 100.625,23.5 ; U1.4@100.75,29.297 U1.4 ; 105.265,23.485 106.25,23.485 JP1.A9@106.56,23.485 ; JP1.A4 JP1.B9 107.2,18.7 108.5,20 108.5,22 107.2,23.3 JP1.B4
  Top Layer w0.5: D2.1 21.585,31.665 22.2,31.05 Q2.1 22.8,30.2 23.7,29.3 v1(43.25,29.3) ; v1(58,28.25) 88,28.25 89.5,26.75 95.5,26.75 97.5,28.75 99.525,28.75 ; 99.525,26.25 99.525,26.75 99.525,28.75 ; U2.1 100.625,23.5 ; U2.3 99.55,26.25 100.564,26.25 ; 100.564,23.561 100.564,26.25 ; U1.4@100.75,29.297 100.203,28.75 99.525,28.75 ; 105.265,23.485 102.725,26.025 102.725,26.05 102.28,26.495 102.22,26.495 101.975,26.25 100.564,26.25
  Bottom Layer w0.25: v1(43.25,29.3) v1@43.25,29.423
  Bottom Layer w0.5: v1(43.25,29.3) 43.25,26.98 D1.1 ; v1@43.25,29.423 43.827,30 48.25,30 50,28.25 v1(58,28.25)
VCC: C3.1 C6.1 U2.5 U3.7 U3.10 | length 9.2
  Top Layer w0.25: 95.25,21.5 U3.7 ; 95.75,20 96.797,20 96.825,19.972 C3.1@96.825,18.5
  Top Layer w0.5: C6.1 95.25,21.5 95.25,20.5 95.75,20 ; C6.1@95.45,23.5 U2.5
VCC1: C7.1 C11.1 C14.2 JP2.1 M1.28 M3.2 R11.2 R12.2 R13.2 R14.2 R17.2 R18.2 U4.5 U6.8 | length 133.6
  Top Layer w0.25: C14.2 C14.2@12.392,53.608 ; JP2.1@15.17,31.25 JP2.1 ; 15.25,26.5 19.5,22.25 24,22.25 ; R13.2 24,22.25 ; R17.2 40.5,20.25 39.5,21.25 R14.2 39.5,24.5 39,25 35.5,25 34.25,23.75 24.25,23.75 24,23.5 24,22.25
  Top Layer w0.5: C14.2 R18.2 11,48.25 10.75,48 10.75,33.75 13.25,31.25 JP2.1@15.17,31.25 ; C14.2@12.392,53.608 U6.8 ; 15.25,26.5 JP2.1 16.92,31.17 18.25,32.5 18.25,36.5 20.7,38.95 32.904,38.95 33.05,38.804 U4.5 C11.1@36.325,38 ; M3.2 31.54,61.79 32.75,63 R11.2 R12.2 ; C11.1@36.6,37.925 M1.28
  Bottom Layer w0.5: v1(12.31,52.679) 12.31,55.31 13.75,56.75 20.192,56.75 24.192,60.75 29.79,60.75 M3.2
VCC2: C8.1 C13.1 C17.1 M2.1 M4.25 U5.5 | length 13.3
  Top Layer w0.25: C13.1@66.075,38 C13.1 ; C8.1 C8.1@68.68,38.13
  Top Layer w0.5: M2.1 C13.1@66.075,38 ; C13.1 C8.1@68.375,37.825 ; U5.5 C8.1@68.3,37.75 ; C8.1@68.68,38.13 M4.25
pads on no net: JP1.A8 JP1.B8 JP1.MH M1.24 M2.13 M2.16 M2.17 M4.2 M4.20 M4.23 M4.24 U2.4 U3.4 U3.5 U3.6 U4.4 U5.4 U6.3 U6.7

## Polygon pours and split planes (outlines as drawn)
GND on Bottom Layer "GND_L02_P001" (solid, remove dead copper, pour order 1): 0,0 0,68 113,68 113,0
GND on Top Layer "GND_L01_P000" (solid, remove dead copper, pour order 0): 0,0 0,68 113,68 113,0

## Keep-outs
Keep-Out Layer:
  the board outline again, w0.254

## Other copper
Top Layer:
  rectangle net GND: 89,56 92,57.5
  rectangle net GND: 88.935,59.013 91.926,60.277
  rectangle net GND: 73,56 76,57.5
  rectangle net GND: 73,58.897 76,60.5
  rectangle net GND: 61.5,50.75 65.5,53
  rectangle net GND: 46.5,49 50.5,53
  rectangle net GND: 23.5,54.25 24.25,56.75
  rectangle net GND: 20.5,54.25 21.923,56.75
  pour cut-out: 61.75,41.75 61.75,41 65.25,41 65.25,41.75
  pour cut-out: 61.75,39.25 61.75,38.5 65.5,38.5 65.5,39.25
  pour cut-out: 45.75,43.25 45.75,38.5 50.25,38.5 50.25,43.25
  pour cut-out: 13.5,55.028 13.5,52.188 18.27,52.188 18.27,55.028
  pour cut-out: 14.25,48.25 14.25,45.34 14.26,45.33 17,45.33 17,48.17
  pour cut-out: 65,59.25 65,57.75 66.092,57.75 66.17,57.672 66.25,57.752 66.25,59.25
  pour cut-out: 62.25,59.25 62.25,57.75 63.5,57.75 63.439,59.15
  pour cut-out: 84.75,62.25 84.75,61 86.25,61 86.25,62 86,62.25
  pour cut-out: 81.75,62.4 81.75,61 83,61 83,62.4
  pour cut-out: 57.25,49.72 57.25,48.28 65.15,48.28 65.15,49.72
  pour cut-out: 46.65,48.857 46.65,45.5 50.15,45.5 50.15,48.75
  pour cut-out: 22,59.5 22,58.11 23.39,58.11 23.39,59.5

## Silkscreen, mask and mechanical layers (free items; w line width, h text height)
Top Overlay:
  text "RF2" at 68.993,66.483 h1
  text "RF1" at 28.993,66.233 h1
  text "RF3" at 89.493,66.233 h1
  text "GND" at 10.9,40.9 h1
  text "DIO" at 11.15,38.4 h1
  text "CLK" at 10.993,35.733 h1
  text "RST" at 10.993,33.233 h1
  text "VCC" at 10.9,30.65 h1
  text "USB" at 107.903,28.323 h1
  text "LoRa BRIDGE" at 60.45,15.95 h1.5
  text "v.2026.10" at 62.2,12.95 h1.5
  text "(c) GBL 2026" at 59.95,9.95 h1.5

## Text inside footprints (layer, text, board x,y; h text height)
D1: Top Overlay "+" at 45.75,22.5 h1.5 r90
D3: Top Overlay "+" at 21.75,22.5 h1.5 r90
D4: Top Overlay "+" at 36.25,24 h1.5 r90